# Altium PCB ESP32_Sound.PcbDoc
Units mil, origin at the board's own origin, x right, y up, seen from the top; angles counter-clockwise.
Board outline 3641.37 x 3436.29 mil, 2 copper layers (Top Layer, Bottom Layer); 51 components, 50 nets, 196 pads, 158 vias.
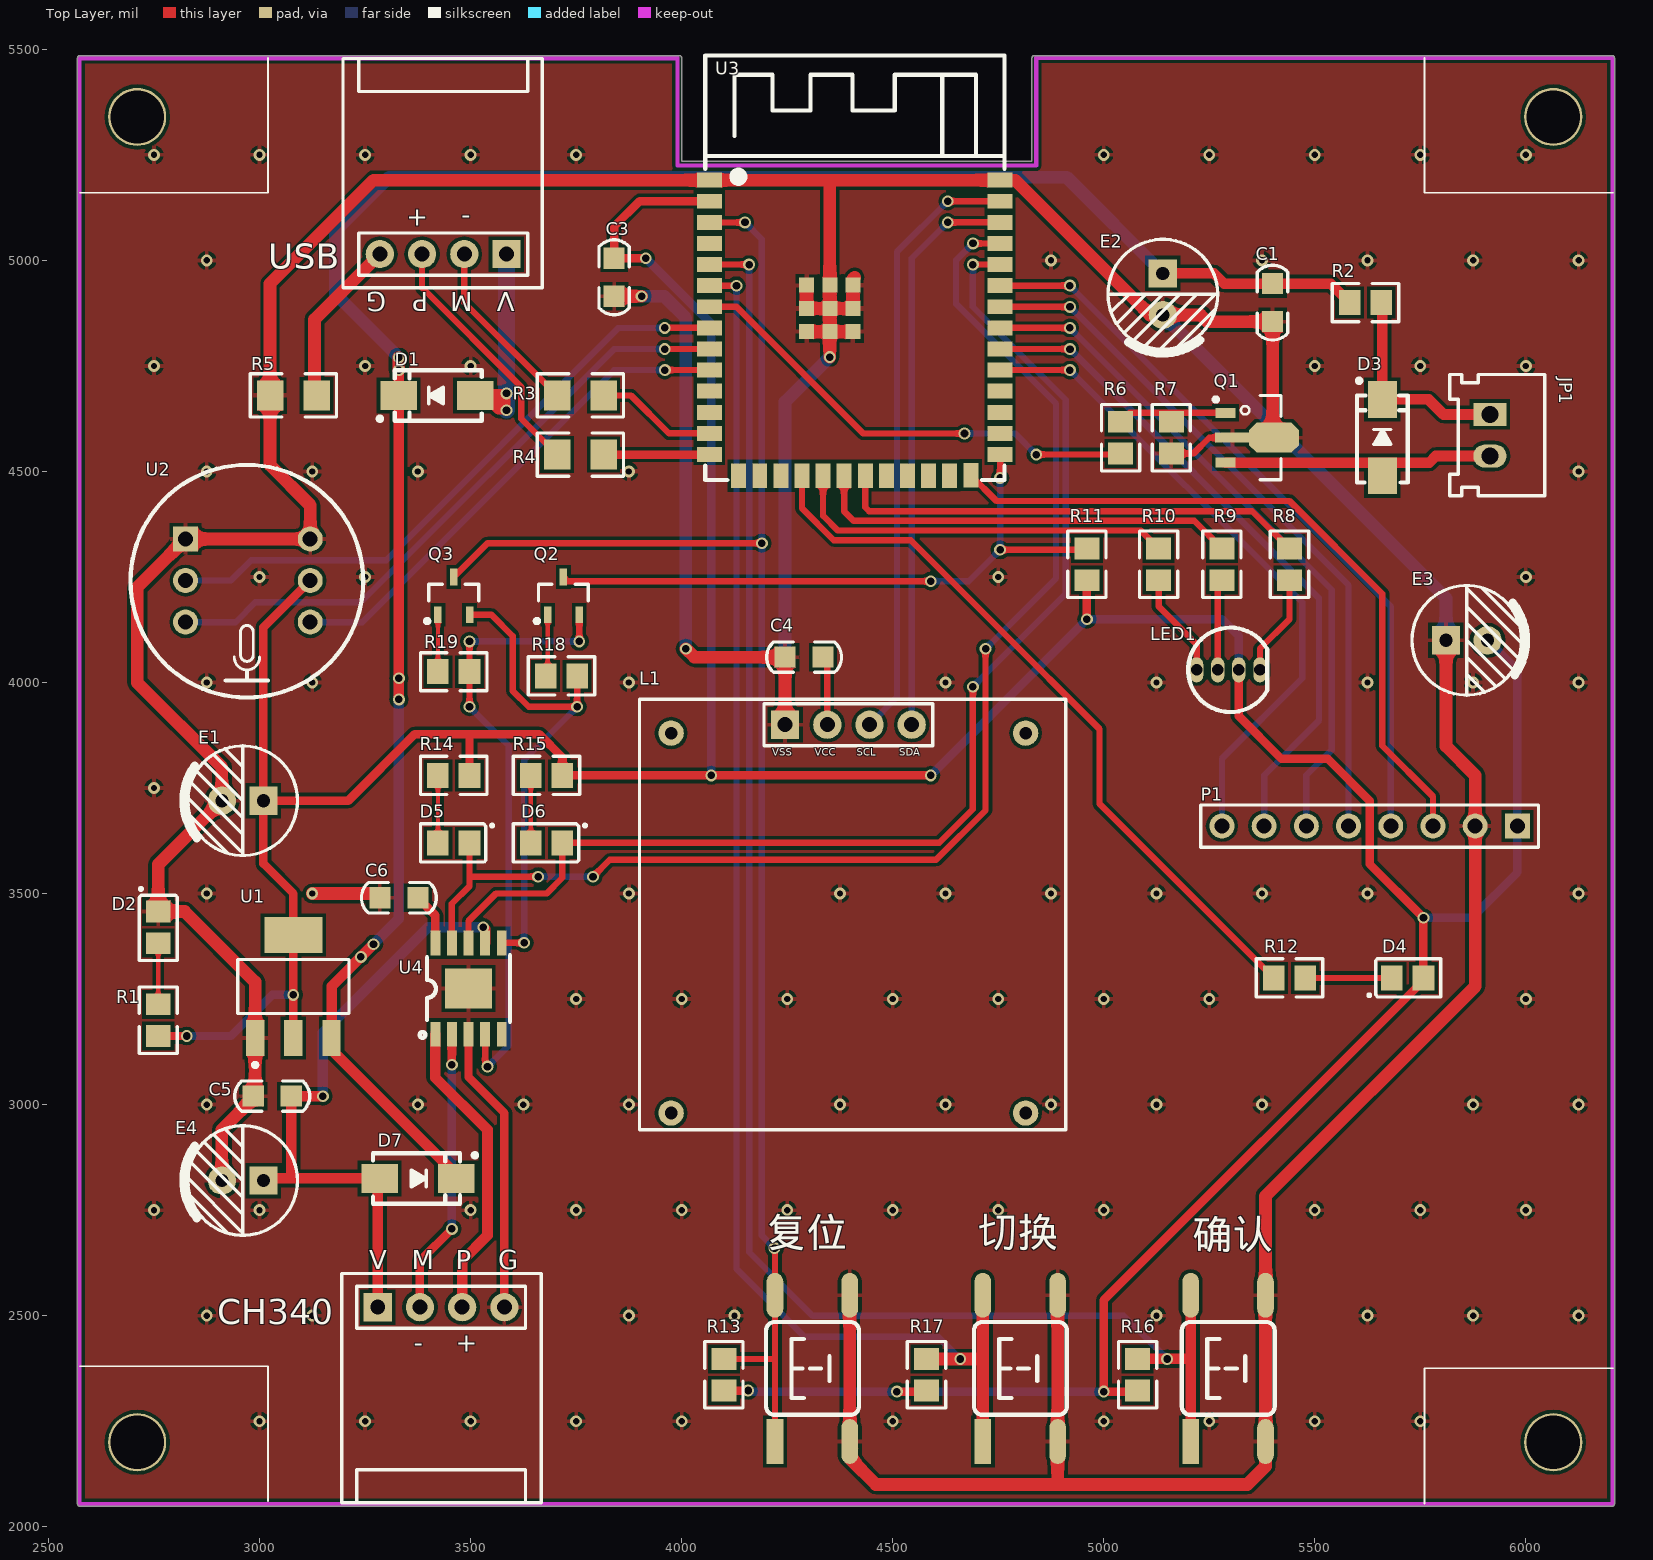
[diagram p0: Top Layer view]
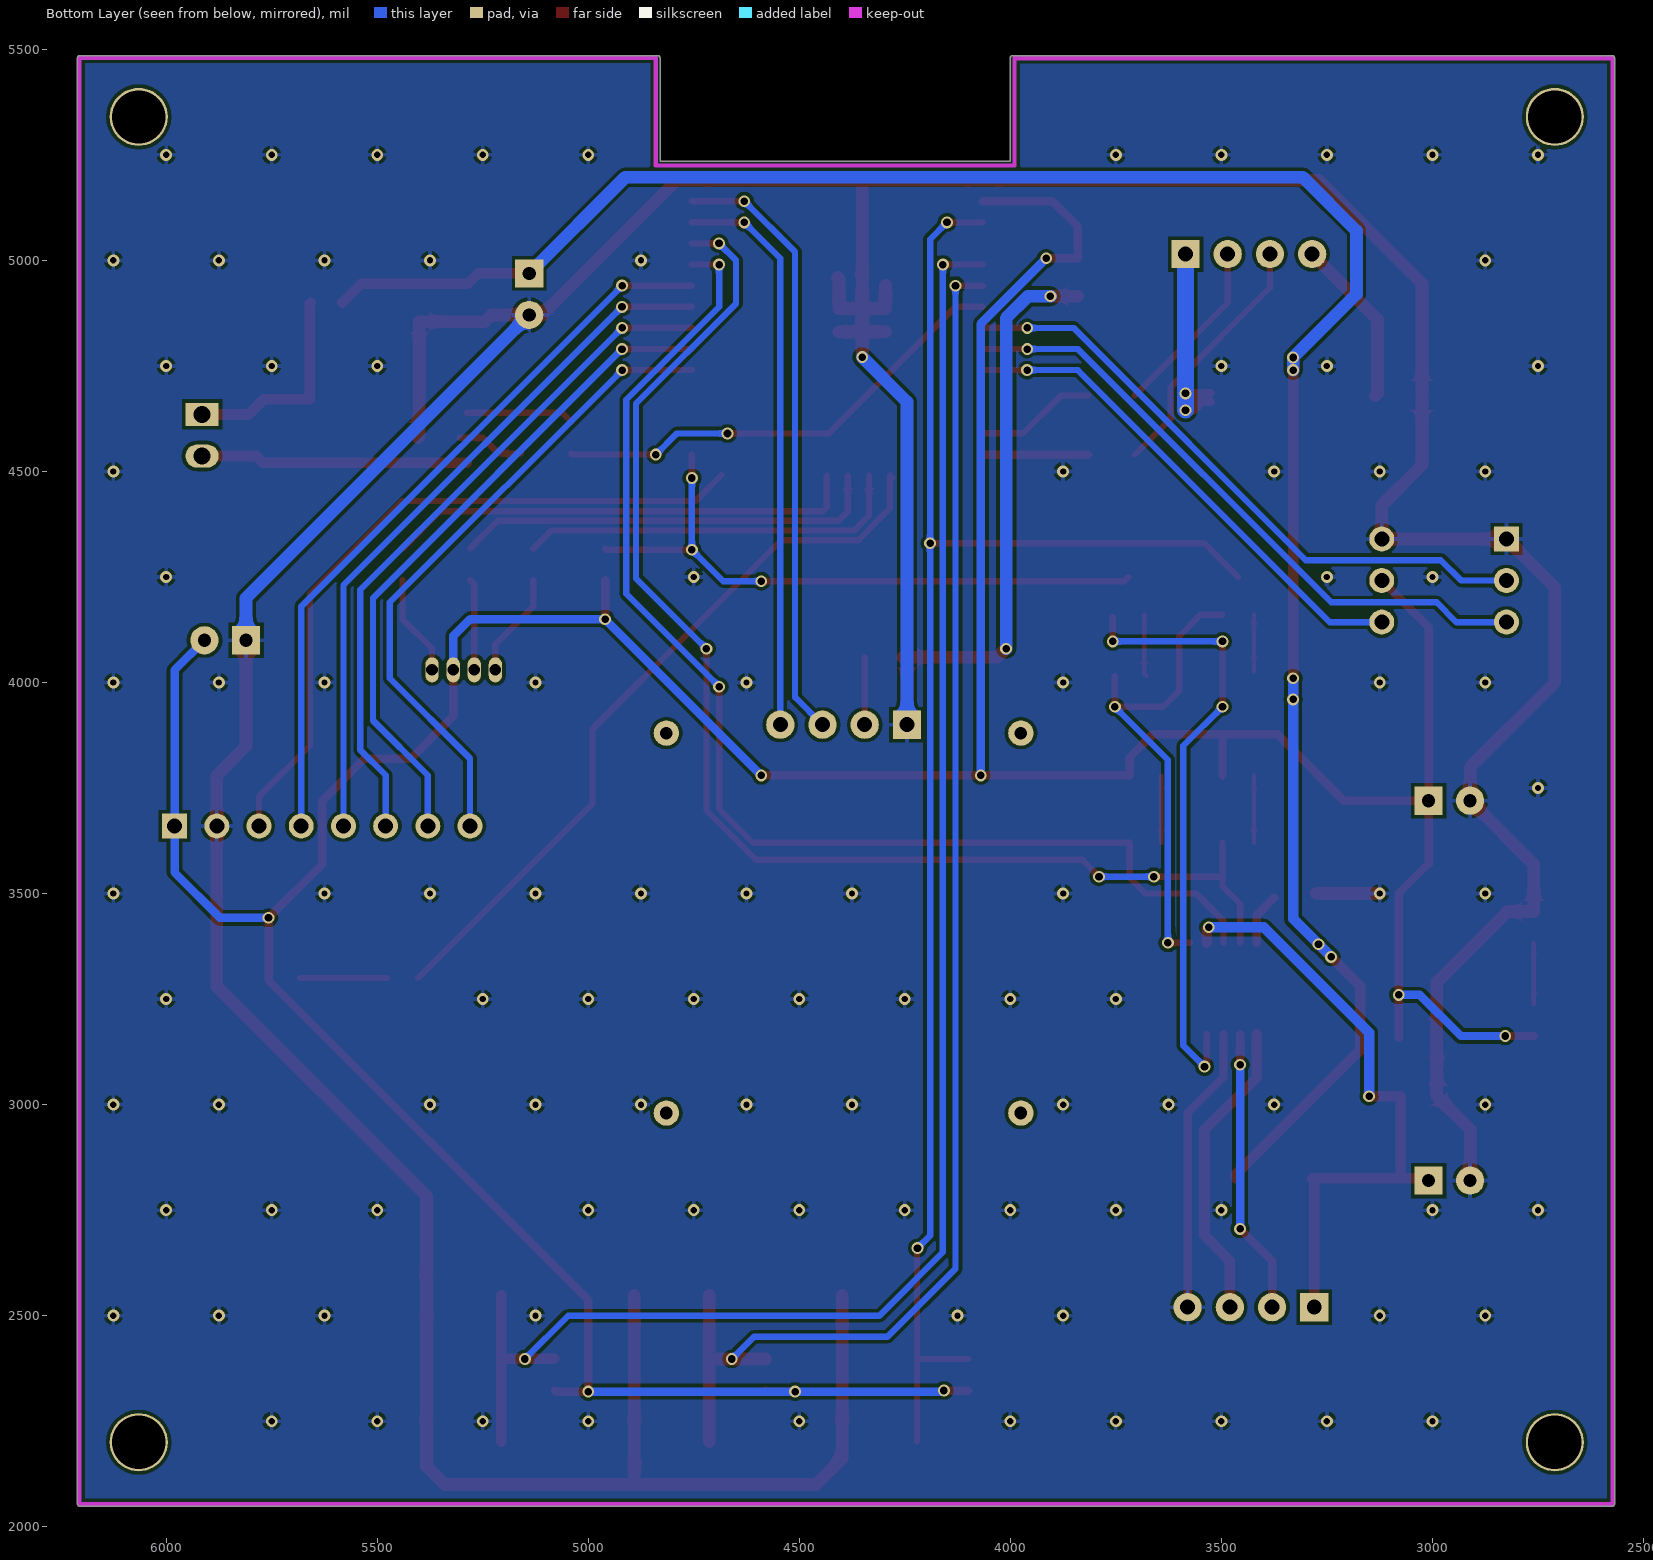
[diagram p1: Bottom Layer view, seen from below]

## Layer stack, top to bottom
Top Layer: signal copper 1.4
Dielectric: dielectric 12.6, FR-4, Dk 4.8
Bottom Layer: signal copper 1.4

## Board outline
2568.65,2053.74 ccw(c2573.66,2053.74) 2573.66,2048.73 6205,2048.73 ccw(c6205,2053.74) 6210.02,2053.74 6210.02,5480 ccw(c6205,5480) 6205,5485.02 4835.01,5485.02 ccw(c4835.01,5480) 4831.47,5483.55 ccw(c4835,5479.99) 4831.46,5483.54 cw(c4835.01,5480) 4831.47,5483.55 4831.45,5483.53 cw(c4835,5479.99) 4831.46,5483.54 ccw(c4835.01,5480) 4831.45,5483.53 ccw(c4835,5479.99) 4829.98,5479.99 4829.98,5235.02 4000.03,5235.02 4000.03,5480 ccw(c3995.01,5480) 3994.96,5485.02 2573.66,5485.02 ccw(c2573.66,5480) 2568.65,5480

## Design rules (kind name [scope] priority, off if disabled: settings)
Clearance [All] p1: gap=8
PolygonConnect [All] p1: connectstyle=Relief reliefconductorwidth=10 reliefentries=4 polygonreliefangle="90 Angle"
RoutingVias [All] p1: holewidth=18 width=28 viastyle="Through Hole" minholewidth=18 minwidth=28 maxholewidth=18 maxwidth=28
SilkscreenOverComponentPads [IsPad] p1: minsilkscreentomaskgap=10
SolderMaskExpansion [All] p1: expansion=4
Width [All] p1: maxlimit=50 minlimit=10 preferedwidth=30
27 further rules are at their usual default settings.

## Components (designator, comment, footprint, x,y, rotation, side; value= is the part's Value field where it differs from the comment)
C1 "104" "C 0805" 5400,4900 r90 top
C3 "104" "C 0805" 3840,4960 r270 top
C4 "10nF" "C 0805" 4290,4060 r0 top
C5 "104" "C 0805" 3030,3020 r0 top
C6 "104" "C 0805" 3330,3490 r180 top
CH340 "USB" H-TypeC 3430,2520 r0 top locked
D1 "M7" DIODE-SMA 3420,4680 r180 top
D2 "LED" LED-0805 2760,3420 r90 top
D3 "M7" DIODE-SMA 5660,4580 r90 top
D4 "LED" LED-0805 5720,3300 r180 top
D5 "LED" LED-0805 3460,3620 r0 top
D6 "LED" LED-0805 3680,3620 r0 top
D7 "M7" DIODE-SMA 3375,2825 r0 top
E1 "220uF/16V" "CAP 2.5*6.3*7" 2960,3720 r180 top
E2 "220uF/16V" "CAP 2.5*6.3*7" 5140,4920 r270 top
E3 "220uF/16V" "CAP 2.5*6.3*7" 5860,4100 r0 top
E4 "220uF/16V" "CAP 2.5*6.3*7" 2960,2820 r180 top
JP1 "HDR-1X2" SIPA02 5915,4635 r270 top
L1 "LCD12864 IIC" LCD12864 4395,3900 r0 top
LED1 "RGB-3528" LED-RGB 5300,4030 r0 top
P1 "Header 8" HDR1X8 5980,3660 r180 top
Q1 "S8050" SOT89_L 5300,4580 r270 top
Q2 "S8050" SOT23-3L 3720,4205.59 r0 top
Q3 "S8050" SOT23-3L 3460,4205.59 r0 top
R1 "1K" "R 0805" 2760,3200 r270 top
R2 "1K" "R 0805" 5620,4900 r0 top
R3 "0R" CR3216-1206 3760,4680 r180 top
R4 "0R" CR3216-1206 3760,4540 r180 top
R5 "0R" CR3216-1206 3080,4680 r0 top
R6 "1K" "R 0805" 5040,4580 r90 top
R7 "10K" "R 0805" 5160,4580 r90 top
R8 "330R" "R 0805" 5440,4280 r90 top
R9 "330R" "R 0805" 5280,4280 r90 top
R10 "330R" "R 0805" 5130,4280 r90 top
R11 "10K" "R 0805" 4960,4280 r270 top
R12 "330R" "R 0805" 5440,3300 r180 top
R13 "10K" "R 0805" 4100,2360 r90 top
R14 "330R" "R 0805" 3460,3780 r0 top
R15 "330R" "R 0805" 3680,3780 r0 top
R16 "10K" "R 0805" 5080,2360 r90 top
R17 "10K" "R 0805" 4580,2360 r90 top
R18 "10K" "R 0805" 3715,4015.59 r180 top
R19 "10K" "R 0805" 3460,4025.59 r180 top
U1 "AMS1117" SOT-223 3080,3280 r0 top
U2 "INMP441" INMP441 2970,4240 r0 top
U3 "ESP32-S3-WROOM-1(N16R8)" WIRELM-SMD_ESP32-S3-WROOM-1 4410,4840 r0 top
U4 "CH340K" ESOP-10_L4.9-W3.9-P1.00-LS6.2-BL-EP 3495,3275 r0 top
USB "USB" H-TypeC 3435,5015 r180 top locked
切换 "SW-PB4" "TSW SMD-6*6*5" 4802.5,2375 r270 top
复位 "SW-PB4" "TSW SMD-6*6*5" 4310,2375 r270 top
确认 "SW-PB4" "TSW SMD-6*6*5" 5295,2375 r270 top

## Footprints (in the part's own frame and the unit in brackets; to place one, negate y for a bottom-side part, rotate by r counter-clockwise, add the part's x,y. Pads: shape width x height; smd on the part's side, far side on the other; paste and mask are expansions set on the pad)
"C 0805" [mil] "无极性贴片电容"
  rect 50x50 smd: 1(-45,0) 2(45,0)
  silkscreen extent -89,-36 89,36, body extent -39,-24 39,24, height 20
"CAP 2.5*6.3*7" [mm] "脚距2.5mm直径6.3mm高度7mm"
  rect 1.7x1.7 hole 0.8: 1(-1.25,0)
  round 1.7 hole 0.8: 2(1.25,0)
  silkscreen extent -3.3,-3.3 3.56,3.3, body extent -3.15,-3.15 3.16,3.15, height 7.03
CR3216-1206 [mm]
  rect 1.6x1.8 smd: 1(-1.4,0) 2(1.4,0)
  silkscreen extent -2.6,-1.3 2.6,1.3, body extent -1.6,-0.8 1.6,0.8, height 0.6
DIODE-SMA [mm] "4.5x2.6*2.2mm（长宽高，不包括引脚）"
  rect 2.2x1.75 smd: 1(-2.3,0) 2(2.3,0)
  silkscreen extent -2.7,-1.52 3.56,1.52, body extent -2.53,-1.3 2.57,1.3, height 2.15
ESOP-10_L4.9-W3.9-P1.00-LS6.2-BL-EP [mm]
  rect 0.6x1.5 smd: 1(-2,-2.75) 2(-1,-2.75) 3(0,-2.75) 4(1,-2.75) 5(2,-2.75) 6(2,2.75) 7(1,2.75) 8(0,2.75) 9(-1,2.75) 10(-2,2.75)
  rect 2.8x2.4 smd: 11(0,0)
  silkscreen extent -2.94,-2.96 2.5,2
H-TypeC [mm] "TYPE-C母座"
  rect 1.7x1.7 hole 0.9: 1(-3.81,0)
  round 1.7 hole 0.9: 2(-1.27,0) 3(1.27,0) 4(3.81,0)
  silkscreen extent -5.97,-11.77 6.03,2.03, body extent -5.08,-1.27 5.08,1.27, height 8.5
HDR1X8 [mm] "Connector; Header; 8 Position"
  rect 1.5x1.5 hole 0.9: 1(0,0)
  round 1.5 hole 0.9: 2(2.54,0) 3(5.08,0) 4(7.62,0) 5(10.16,0) 6(12.7,0) 7(15.24,0) 8(17.78,0)
  silkscreen extent -1.27,-1.27 19.05,1.27
INMP441 [mm] "INMP441-模块"
  rect 1.5x1.5 hole 0.9: 1(-3.69,2.54)
  round 1.5 hole 0.9: 2(-3.69,0.04) 3(-3.69,-2.46) 4(3.81,-2.46) 5(3.81,0.04) 6(3.81,2.54)
  silkscreen extent -7,-7 7,7
LCD12864 [mil] "LCD-SSD1306/SSD1315"
  round 60 hole 30: 0(-420,-920) 0(-420,-20) 0(420,-920) 0(420,-20)
  rect 66.93x66.93 hole 35.43: 1(-150,0)
  round 66.93 hole 35.43: 2(-50,0) 3(50,0) 4(150,0)
  silkscreen extent -495,-960 515,60, body extent -506,-954 546,50, height 335
LED-0805 [mm] "LED-0805"
  rect 1.3x1.5 smd: 1(-0.95,0) 2(0.95,0)
  silkscreen extent -2,-1.15 2.36,1.15, body extent -1,-0.63 1,0.62, height 0.7
LED-RGB [mm] "三基色二极管"
  oval 0.8x1.5 hole 0.7: 1(1.778,0) 2(0.5,0) 3(-0.762,0) 4(-2.032,0)
  silkscreen extent -2.54,-2.54 2.22,2.54
"R 0805" [mm]
  rect 1.3x1.5 smd: 1(-0.95,0) 2(0.95,0)
  silkscreen extent -2,-1.15 2,1.15, body extent -1,-0.63 1,0.63, height 0.55
SIPA02 [mm]
  rect 1.4x2 hole 1: 1(0,0)
  oval 1.4x2 hole 1: 2(2.5,0)
  silkscreen extent -2.41,-2.41 4.88,3.3, body extent -2.51,-2.3 4.99,3.4, height 7
SOT23-3L [mm]
  rect 0.45x1 smd: 1(-0.95,-1.143) 2(0.95,-1.143) 3(0,1.125)
  silkscreen extent -1.72,-1.65 1.5,0.7, body extent -1.5,-1.2 1.5,1.2, height 1.05
SOT89_L [mm] "4.6x4.3x1.6mm(长宽高)"
  rect 0.6x1.2 smd: 1(-1.5,-0.303) 3(1.5,-0.303)
  oct 1.8x3 smd: 2(0,2.616)
  rect 0.6x2.1 smd: 2(0,0.127)
  silkscreen extent -2.54,-1 2.54,3.05, body extent -2.3,-0.88 2.3,3.42, height 1.6
SOT-223 [mm]
  rect 1.1x2.15 smd: 1(-2.3,-3.1) 2(0,-3.1) 3(2.3,-3.1)
  rect 3.5x2.15 smd: 2(0,3.1)
  silkscreen extent -3.35,-4.85 3.35,1.63, body extent -3.25,-3.48 3.25,3.48, height 1.7
"TSW SMD-6*6*5" [mm]
  rect 2.7x1 smd: 1(4.4,-2.261)
  oval 2.7x1 smd: 2(4.4,2.239) 3(-4.4,2.239) 4(-4.4,-2.261)
  silkscreen extent -2.79,-2.79 2.79,2.79, body extent -4.5,-3 4.5,3, height 4.25
WIRELM-SMD_ESP32-S3-WROOM-1 [mm]
  rect 1.5x0.9 smd paste+0 mask+0.05: 1(-8.75,8.895) 2(-8.75,7.625) 3(-8.75,6.355) 4(-8.75,5.085) 5(-8.75,3.815) 6(-8.75,2.545) 7(-8.75,1.275) 8(-8.75,0.005) 9(-8.75,-1.265) 10(-8.75,-2.535) 11(-8.75,-3.805) 12(-8.75,-5.075) 13(-8.75,-6.345) 14(-8.75,-7.615) 27(8.75,-7.615) 28(8.75,-6.345) 29(8.75,-5.075) 30(8.75,-3.805) 31(8.75,-2.535) 32(8.75,-1.265) 33(8.75,0.005) 34(8.75,1.275) 35(8.75,2.545) 36(8.75,3.815) 37(8.75,5.085) 38(8.75,6.355) 39(8.75,7.625) 40(8.75,8.895)
  rect 0.9x1.5 smd paste+0 mask+0.05: 15(-6.985,-8.895) 16(-5.715,-8.895) 17(-4.445,-8.895) 18(-3.175,-8.895) 19(-1.905,-8.895) 20(-0.635,-8.895) 21(0.635,-8.895) 22(1.905,-8.895) 23(3.175,-8.895) 24(4.445,-8.895) 25(5.715,-8.895) 26(6.985,-8.865)
  rect 0.9x0.9 smd: 41(-2.9,-0.225) 41(-2.9,1.175) 41(-2.9,2.575) 41(-1.5,-0.225) 41(-1.5,1.175) 41(-1.5,2.575) 41(-0.1,-0.225) 41(-0.1,1.175) 41(-0.1,2.575)
  silkscreen extent -9,-9.14 9.02,16.39

## Part data
C1: library part Cap, "无极性电容"
C3 C4 C5 C6: library part Cap, "Capacitor"
CH340 USB: "USB接口"
D1 D3 D7: library part SS24, "肖特基二极管"
D2 D4 D5 D6: "发光二极管"
E1 E2 E3 E4: library part C-CD, "贴片钽电容"
JP1: library part "Header 2", "2P接插件"
L1: "LCD SSD1306/SSD1315"
LED1: library part LED-RGB-3528, "三基色LED"
P1: "Header, 8-Pin"
Q1 Q2 Q3: "NPN三极管"
R1 R2 R3 R4 R5 R6 R7 R8 R9 R10 R11 R12 R13 R14 R15 R16 R17 R18 R19: library part R-SMT, "Resistor"
U1: "POSITIVE OUTPUT VOLTAGE"
U2: "INMP441模块-鹿小班"
切换 复位 确认: "微动开关"

## Free pads (board coordinates)
  round 137.8 hole 125.98: 0(2710,2200) 0(2710,5340) 0(6065,2200) 0(6065,5340)

## Via types
v1: diameter 28, hole 15, Top Layer to Bottom Layer, 99 vias
v2: diameter 28, hole 18, Top Layer to Bottom Layer, 59 vias

## Nets (pads, with @x,y where several pads share a name; then routed paths per layer and width w, separated by ;. In a path a pad name is that pad's centre, name@x,y a point inside that pad or via, vN(x,y) a via of type N, cw(c..) or ccw(c..) an arc to the next point about the centre after c; other vN are vias at no path point)
3V3: C3.1 D4.1 E1.1 E3.2 LED1.2 P1.1 R1.2 R11.2 R13.1 R14.2 R15.2 R16.1 R17.1 U1.2 U2.5 U3.2 | length 10378.6
  Top Layer w20: R1.2 v2(2827.4,3162.6) ; U1.2@3080,3157.95 3080,3402.05 3080,3500 3009.21,3570.79 E1.1 ; U2.5 3009.21,4130.79 E1.1 ; R14.2 3497.4,3877.4 ; v2(3915,5005) C3.1 3840,5080 3900.2,5140.19 U3.2 ; R13.1 v2(4157.4,2322.6) ; v2(4510,2320) 4577.4,2320 R17.1 ; v2(4590,3780) v2(4070,3780) R15.2 3717.4,3822.6 3662.6,3877.4 3497.4,3877.4 ; v2(4960,4150) R11.2 ; R16.1 5077.4,2320 v2(5000,2320) 5000,2536.83 5757.4,3294.23 D4.1 v2(5757.4,3442.6) 5630,3570 5630,3720 5531.05,3818.95 5421.05,3818.95 5319.69,3920.32 LED1.2 5319.69,3980.32 ; E1.1 3210,3720 3367.4,3877.4 3497.4,3877.4
  Bottom Layer w20: v2(2827.4,3162.6) 2932.6,3162.6 3030,3260 v2(3080,3260) ; v2(3915,5005) 4070,4850 v2(4070,3780) ; v2(4157.4,2322.6) 4160,2320 v2(4510,2320) v2(5000,2320) ; v2(4590,3780) v2(4960,4150) 5280,4150 5319.69,4110.31 LED1.2 ; v2(5757.4,3442.6) 5872.6,3442.6 5980,3550 P1.1 ; E3.2 5980,4029.21 P1.1 ; 5980,3590 P1.1
4V: C1.2 D1.2 D7.2 E2.1 R2.1 U1.3 | length 5226.3
  Top Layer w25: v2(3270,3380) 3170.55,3280.55 U1.3 3170.55,3129.45 3465.55,2834.45 D7.2 ; v2@3329.45,4770 3329.45,3960.55 v2(3330,3960) ; E2.1 5260.79,4969.21 5285,4945 C1.2 5537.6,4945 R2.1
  Top Layer w30: v2(3330,4740) v2(3330,4770)
  Bottom Layer w25: v2(3240,3350) 3330,3440 v2(3330,4010)
  Bottom Layer w30: v2(3330,4740) v2(3330,4770) 3180,4920 3180,5070 3307,5197 4912.21,5197 E2.1
BOOT: Q2.3 R11.1 U3.27 | length 1501.9
  Top Layer w15: Q2.3 3729.88,4240 v2(4590,4240) ; v2(4754.49,4314.49) 4957.09,4314.49 R11.1 ; v2(4754.49,4484.49) U3.27
  Bottom Layer w15: v2(4590,4240) 4680,4240 v2(4754.49,4314.49) v2(4754.49,4484.49)
D+: R4.1 U3.14 | length 250.5
  Top Layer w20: R4.1 4065.32,4540 U3.14
D-: R3.1 U3.13 | length 287.6
  Top Layer w15: R3.1 3880,4680 3969.8,4590.19 U3.13
GND: C1.1 C3.2 C4.1 C5.1 C6.2 CH340.4 D2.2 E1.2 E2.2 E3.1 E4.2 L1.1 P1.2 Q1.2 R5.1 R7.1 U1.1 U2.1 U2.6 U3.1 U3.40 U3.41 U4.3 U4.11 切换.2 切换.3 复位.2 复位.3 确认.2 确认.3 | length 14875.8
  Top Layer w15: R5.1@3024.88,4670 R5.1 ; R7.1 5212.6,4542.6 5250,4580 Q1.2@5305,4580
  Top Layer w20: U4.3 3495,3065 3580,2980 CH340.4
  Top Layer w30: E4.2 2910.79,2940.79 2989.45,3019.45 U1.1 2989.45,3290.55 2822.6,3457.4 D2.2 2760,3569.21 E1.2 2910.79,3799.21 2710,4000 2710,4225.28 U2.1 U2.6 3120,4420 3024.88,4515.12 R5.1@3024.88,4670 ; R5.1 3024.88,4944.88 3270.2,5190.19 U3.1 4350,5190.19 ; v1(3125,3500) C6.2@3275,3500 ; C3.2 v2(3905,4915) ; v2(4010,4080) 4030,4060 C4.1 ; L1.1 4245,4050 C4.1@4255,4060 ; U3.41@4295.82,4831.14 U3.41@4350.94,4831.14 ; U3.41@4295.82,4941.38 4295.82,4886.26 4406.06,4886.26 4406.06,4956.06 4410,4960 ; v2(4350.94,4770.94) U3.41@4350.94,4831.14 ; 复位.3 复位.2 4398.17,2161.83 4460,2100 4570,2100 4900,2100 ; U3.41@4406.06,4831.14 U3.41@4350.94,4831.14 ; 切换.3 切换.2 4890.67,2109.33 4900,2100 ; Q1.2@5403,4580 5400,4583 C1.1 5245,4855 5229.21,4870.79 E2.2 5109.21,4870.79 4789.81,5190.19 U3.40 4350,5190.19 ; E3.1 5810.79,3849.21 5880,3780 P1.2 5880,3280 5383.17,2783.17 确认.3 5383.17,2220 确认.2 5383.17,2143.17 5340,2100 4900,2100 ; 4350,5190.19 4350.94,5189.26 4350.94,4941.38 4350.94,4886.26 U3.41@4350.94,4831.14
  Bottom Layer w30: v2(3905,4915) 3958.33,4915 4010,4863.33 v2(4010,4080) ; L1.1 4245,4665 v2(4350.94,4770.94) ; E2.2 5810.79,4200 E3.1
  other v1: 3000,2250 3250,2250 3500,2250 3750,2250 4000,2250 4500,2250 5000,2250 5250,2250 5500,2250 5750,2250 2875,2500 3125,2500 3875,2500 4125,2500 5125,2500 5625,2500 5875,2500 6125,2500 2750,2750 3000,2750 3500,2750 3750,2750 4000,2750 4250,2750 4500,2750 4750,2750 5000,2750 5500,2750 5750,2750 6000,2750 2875,3000 3375,3000 3625,3000 3875,3000 4375,3000 4625,3000 4875,3000 5125,3000 5375,3000 5875,3000 6125,3000 3750,3250 4000,3250 4250,3250 4500,3250 4750,3250 5000,3250 5250,3250 6000,3250 2875,3500 3875,3500 4375,3500 4625,3500 4875,3500 5125,3500 5375,3500 5625,3500 6125,3500 2750,3750 2875,4000 3125,4000 3875,4000 4625,4000 5125,4000 5625,4000 5875,4000 6125,4000 3000,4250 3250,4250 4750,4250 6000,4250 2875,4500 3125,4500 3375,4500 3875,4500 6125,4500 2750,4750 3250,4750 3500,4750 5500,4750 5750,4750 6000,4750 2875,5000 4875,5000 5375,5000 5625,5000 5875,5000 6125,5000 2750,5250 3000,5250 3250,5250 3500,5250 3750,5250 5000,5250 5250,5250 5500,5250 5750,5250 6000,5250
IO1_SCL: L1.3 U3.39 | length 1441.2
  Top Layer w15: v2(4630.19,5140.19) U3.39
  Bottom Layer w15: L1.3 4510,3965 4510,4860 4510,5020 v2(4630.19,5140.19)
IO2_SDA: L1.4 U3.38 | length 1349.8
  Top Layer w15: v2(4630.19,5090.19) U3.38
  Bottom Layer w15: L1.4 4545,5005 v2(4630.19,5090.19)
IO5_KEY1: R16.2 U3.5 确认.1 确认.4 | length 4004.8
  Top Layer w15: U3.5 v2(4159.81,4990.19)
  Top Layer w25: R16.2 v2(5150,2397.4) 5198.6,2397.4 5206,2390 ; 确认.1 5206,2390 ; 确认.4 5206,2390
  Bottom Layer w15: v2(4159.81,4990.19) 4159.81,2650 4309.9,2499.9 5047.5,2499.9 v2(5150,2397.4)
IO6_KEY2: R17.2 U3.6 切换.1 切换.4 | length 3495.1
  Top Layer w15: U3.6 4129.81,4940.19 v2(4130,4940)
  Top Layer w30: R17.2 v2(4660,2397.4) 4706.1,2397.4 4713.5,2390 ; 切换.1 4713.5,2390 ; 切换.4 4713.5,2390
  Bottom Layer w15: v2(4130,4940) 4130,2611 4291,2450 4607.4,2450 v2(4660,2397.4)
IO7_PWM: R6.1 U3.7 | length 1120.6
  Top Layer w15: U3.7 4129.81,4890.19 4430,4590 v2(4670,4590) ; v2(4840,4540) 5037.4,4540 R6.1
  Bottom Layer w15: v2(4670,4590) 4790,4590 v2(4840,4540)
IO10_LED4: R12.2 U3.18 | length 1766.7
  Top Layer w15: U3.18@4280,4484.81 U3.18 4285,4412.47 4360.47,4337 4543,4337 4750,4130 4990,3890 4990,3712.6 R12.2
IO11_LED1: R10.2 U3.19 | length 921.9
  Top Layer w15: U3.19 4335,4395 4370,4360 5087.4,4360 R10.2
IO12_LED2: R9.2 U3.20 | length 1016.1
  Top Layer w15: U3.20 4385,4405 4407,4383 5214.4,4383 R9.2
IO13_LED3: R8.2 U3.21 | length 1120.2
  Top Layer w15: U3.21 4435,4415 4444,4406 5351.4,4406 R8.2
IO15_WS: U2.2 U3.8 | length 1488.7
  Top Layer w15: v2(3960,4840) 3960.2,4840.19 U3.8
  Bottom Layer w15: U2.2 2931.57,4241.57 2980,4290 3300,4290 3850,4840 v2(3960,4840)
IO16_SCK: U2.3 U3.9 | length 1508.8
  Top Layer w15: v2(3960,4790) 3960.2,4790.19 U3.9
  Bottom Layer w15: U2.3 2943.15,4143.15 2990,4190 3240,4190 3840,4790 v2(3960,4790)
IO17_SD: U2.4 U3.10 | length 1192.8
  Top Layer w15: v2(3960.2,4740.19) U3.10
  Bottom Layer w15: U2.4 3243.15,4143.15 3840.2,4740.19 v2(3960.2,4740.19)
IO38: P1.8 U3.31 | length 1552.1
  Top Layer w15: U3.31 v2(4919.81,4740.19)
  Bottom Layer w15: v2(4919.81,4740.19) 5470,4190 5470,4010 5280,3820 P1.8
IO39: P1.7 U3.32 | length 1593.8
  Top Layer w15: U3.32 4754.69,4790 v2(4920,4790)
  Bottom Layer w15: v2(4920,4790) 5510,4200 5510,3910 5380,3780 P1.7
IO40: P1.6 U3.33 | length 1627.3
  Top Layer w15: U3.33 v2(4919.81,4840.19)
  Bottom Layer w15: v2(4919.81,4840.19) 5540,4220 5540,3840 5480,3780 P1.6
IO41: P1.5 U3.34 | length 1669
  Top Layer w15: U3.34 4754.69,4890 v2(4920,4890)
  Bottom Layer w15: v2(4920,4890) 5580,4230 P1.5
IO42: P1.4 U3.35 | length 1760.4
  Top Layer w15: U3.35 v2(4919.81,4940.19)
  Bottom Layer w15: v2(4919.81,4940.19) 5680,4180 P1.4
IO45: P1.3 U3.26 | length 1691.1
  Top Layer w15: U3.26 4745.98,4430 5440,4430 5660,4210 5660,3850 5780,3730 P1.3
NetC4_2: C4.2 L1.2 | length 160
  Top Layer w15: L1.2 C4.2@4345,4060
NetC6_1: C6.1 U4.10 | length 123.8
  Top Layer w20: C6.1 3416.26,3448.74 U4.10
NetCH340_2: CH340.2 U4.2 | length 678.1
  Top Layer w20: CH340.2 3380,2630 v2(3455.63,2705.63) ; v2(3455.63,3094.37) U4.2
  Bottom Layer w20: v2(3455.63,2705.63) v2(3455.63,3094.37)
NetCH340_3: CH340.3 U4.1 | length 722.8
  Top Layer w25: U4.1 3416.26,3063.74 3540,2940 3540,2690.5 3480,2630.5 CH340.3
NetD1_1: D1.1 USB.1 | length 570.1
  Top Layer w20: D1.1@3525.55,4665 3585,4665 ; D1.1@3525.55,4685 v2(3585,4685) v2(3585,4645) 3565,4645 D1.1@3550,4660
  Bottom Layer w40: v2(3585,4645) USB.1
NetD2_1: D2.1 R1.1 | length 145.2
  Top Layer w10: R1.1 D2.1
NetD3_1: D3.1 JP1.2 Q1.3 | length 633.4
  Top Layer w25: Q1.3 5770.94,4520.94 5786.57,4536.57 JP1.2
NetD3_2: D3.2 JP1.1 R2.2 | length 500.3
  Top Layer w25: R2.2 5660,4897.4 D3.2 5769.45,4670.55 5805,4635 JP1.1
NetD4_2: D4.2 R12.1 | length 205.2
  Top Layer w15: R12.1 D4.2
NetD5_1: D5.1 R14.1 | length 160
  Top Layer w10: D5.1 R14.1
NetD6_1: D6.1 R15.1 | length 160
  Top Layer w10: D6.1 R15.1
NetLED1_1: LED1.1 R8.1 | length 241.6
  Top Layer w15: LED1.1 5370,4080 5440,4150 R8.1
NetLED1_3: LED1.3 R9.1 | length 216.7
  Top Layer w15: LED1.3 5270,4232.6 R9.1
NetLED1_4: LED1.4 R10.1 | length 249.9
  Top Layer w15: R10.1 5130,4180 5220,4090 LED1.4
NetQ1_1: Q1.1 R6.2 R7.2 | length 257
  Top Layer w15: R6.2 5061.65,4639.06 Q1.1
NetQ2_1: Q2.1 R18.2 | length 147.1
  Top Layer w10: R18.2 3682.6,4020.59 Q2.1
NetQ2_2: Q2.2 R19.1 U4.4 | length 1467.2
  Top Layer w15: v2(3497.4,3942.6) R19.1 v2(3497.4,4097.4) ; U4.4 3534.37,3095.63 v2(3540,3090) ; v2(3757.4,4097.4) Q2.2@3757.4,4155.39
  Bottom Layer w15: v2(3497.4,3942.6) 3590,3850 3590,3140 v2(3540,3090) ; v2(3497.4,4097.4) v2(3757.4,4097.4) v2@3760,4100
NetQ3_1: Q3.1 R19.2 | length 135
  Top Layer w10: R19.2 Q3.1
NetQ3_2: Q3.2 R18.1 U4.6 | length 1158.9
  Top Layer w15: Q3.2 3549.41,4160.59 3600,4110 3600,3980 3637.6,3942.4 v2(3752.4,3942.4) R18.1 ; U4.6 v2(3626.74,3383.26)
  Bottom Layer w15: v2(3626.74,3383.26) 3626.74,3816.74 v2(3752.4,3942.4)
NetR3_2: R3.2 USB.2 | length 426.1
  Top Layer w15: USB.2 3485,4899.88 R3.2
NetR4_2: R4.2 USB.3 | length 607.5
  Top Layer w15: USB.3 3385,4935 3620,4700 3620,4624.88 R4.2
NetR5_2: R5.2 USB.4 | length 401.3
  Top Layer w30: R5.2 3130,4685.12 3130,4860 USB.4
RESET: Q3.3 R13.2 U3.3 复位.1 复位.4 | length 3887.5
  Top Layer w15: Q3.3 3540.12,4330 v2(4190,4330) ; U3.3 4065.7,5090 v2(4150,5090) ; R13.2 4218.4,2397.4 4221,2400 ; v2(4220,2660) 4221,2659 复位.4 4221,2400 ; 复位.1 4221,2400
  Bottom Layer w15: v2(4150,5090) 4190,5050 v2(4190,4330) 4190,2690 v2(4220,2660)
RXD0: D6.2 U3.36 U4.8 | length 2941.7
  Top Layer w15: U4.8 3495,3435 3560,3500 3680,3500 3717.4,3537.4 D6.2 4610,3620 4690,3700 v2(4690,3990) ; v2(4690,4990) 4690.19,4990.19 U3.36
  Bottom Layer w15: v2(4690,3990) 4910,4210 4910,4530 4910,4670 4690,4890 v2(4690,4990)
TXD0: D5.2 U3.37 U4.9 | length 3132.9
  Top Layer w15: U4.9 3455.63,3475.63 3497.4,3517.4 3497.4,3540 ; D5.2 3497.4,3540 ; v2(3660,3540) 3497.4,3540 ; v2(3790,3540) 3830,3580 4602.53,3580 4720,3697.47 v2(4720,4080) ; v2(4690.19,5040.19) U3.37
  Bottom Layer w15: v2(3660,3540) v2(3790,3540) ; v2(4690.19,5040.19) 4650,5000 4650,4900 4650,4897.47 4887,4660.47 4887,4247 v2(4720,4080)
USB5V: C5.2 CH340.1 D7.1 E4.1 U4.7 | length 1528.3
  Top Layer w25: E4.1 3014.21,2825 3080,2825 ; v2(3150,3020) C5.2 3075,2830 3080,2825 ; CH340.1 3280,2820.55 D7.1 3080,2825 ; v2(3530,3420) 3534.37,3415.63 U4.7
  Bottom Layer w25: v2(3150,3020) 3150,3170 3400,3420 v2(3530,3420)
pads on no net: L1.0 U3.4 U3.11 U3.12 U3.15 U3.16 U3.17 U3.22 U3.23 U3.24 U3.25 U3.28 U3.29 U3.30 U4.5

## Polygon pours and split planes (outlines as drawn)
GND on Bottom Layer "GND_L02_P005" (solid, pour order 5): 3998.23,5229.98 4828.18,5229.98 4828.18,5474.95 6208.2,5474.95 6208.21,5474.97 6208.21,2048.71 2576.88,2048.71 2571.86,2043.69 2566.85,2048.71 2566.85,5474.97 3988.14,5474.97 3993.16,5479.98 3998.23,5474.91
GND on Top Layer "GND_L01_P006" (solid, pour order 6): 4827.16,5233.1 4827.16,5480.14 4828.63,5481.61 4832.16,5478.08 6207.19,5478.08 6207.19,2083.35 6188.92,2065.08 2584.09,2065.08 2584.09,5471.16 2577.23,5478.03 3997.21,5478.03 3997.21,5238.11 3992.19,5233.1

## Keep-outs
Keep-Out Layer:
  lines w10: 3988.94,5478.94 2573.66,5478.94 2573.66,2053.74 6205,2053.74 6205,5480 4840,5480 4840,5225 3990,5225 3990,5480

## Silkscreen, mask and mechanical layers (free items; w line width, h text height)
Top Overlay:
  lines w3.94: 2573.66,2380 3020,2380 3020,2060 ; 2573.66,5160 3020,5160 3020,5480 ; 5760,2055 5760,2375 6206.34,2375 ; 5760,5480 5760,5160 6206.34,5160
Mechanical 1:
  lines w10: 3995.01,5230.02 3995.01,5480 2573.66,5480 2573.66,2053.74 6205,2053.74 ; 3995.03,5230 4834.97,5230 ; 4835,5230.03 4835,5479.99 ; 6205,3015 6205,3239.99 ; 6205,3070 6205,2053.74 ; 4835,5479.99 4835.01,5480 ; 4835.01,5480 6205,5480 6205,2053.74 ; 6204.99,3240 6205,3239.99

## Text inside footprints (layer, text, board x,y; h text height)
CH340: Top Overlay "V" at 3260,2610 h45; Top Overlay "P" at 3465,2610 h45; Top Overlay "M" at 3360,2610 h45; Top Overlay "G" at 3565,2610 h45; Top Overlay "-" at 3365,2415 h45; Top Overlay "+" at 3465,2415 h45
L1: Top Overlay "SCL" at 4415,3820 h30; Top Overlay "VCC" at 4315,3820 h30; Top Overlay "VSS" at 4215,3820 h30; Top Overlay "SDA" at 4515,3820 h30
USB: Top Overlay "V" at 3605,4925 h45 r180; Top Overlay "P" at 3400,4925 h45 r180; Top Overlay "M" at 3505,4925 h45 r180; Top Overlay "G" at 3300,4925 h45 r180; Top Overlay "-" at 3500,5120 h45 r180; Top Overlay "+" at 3400,5120 h45 r180